# Altium PCB BMS042A_PCB.PcbDoc (part 5 of 5)
Units mil, origin at the board's own origin, x right, y up, seen from the top; angles counter-clockwise.
Board outline 4409.45 x 3307 mil, 6 copper layers (Top Layer, Layer 2 - PGND, Layer 3, Layer 4, Layer 5 - PGND, Bottom Layer), stack 60.8 mil thick; 273 components, 77 nets, 544 pads, 927 vias.
Unrouted connection lines stored in the file: 219.
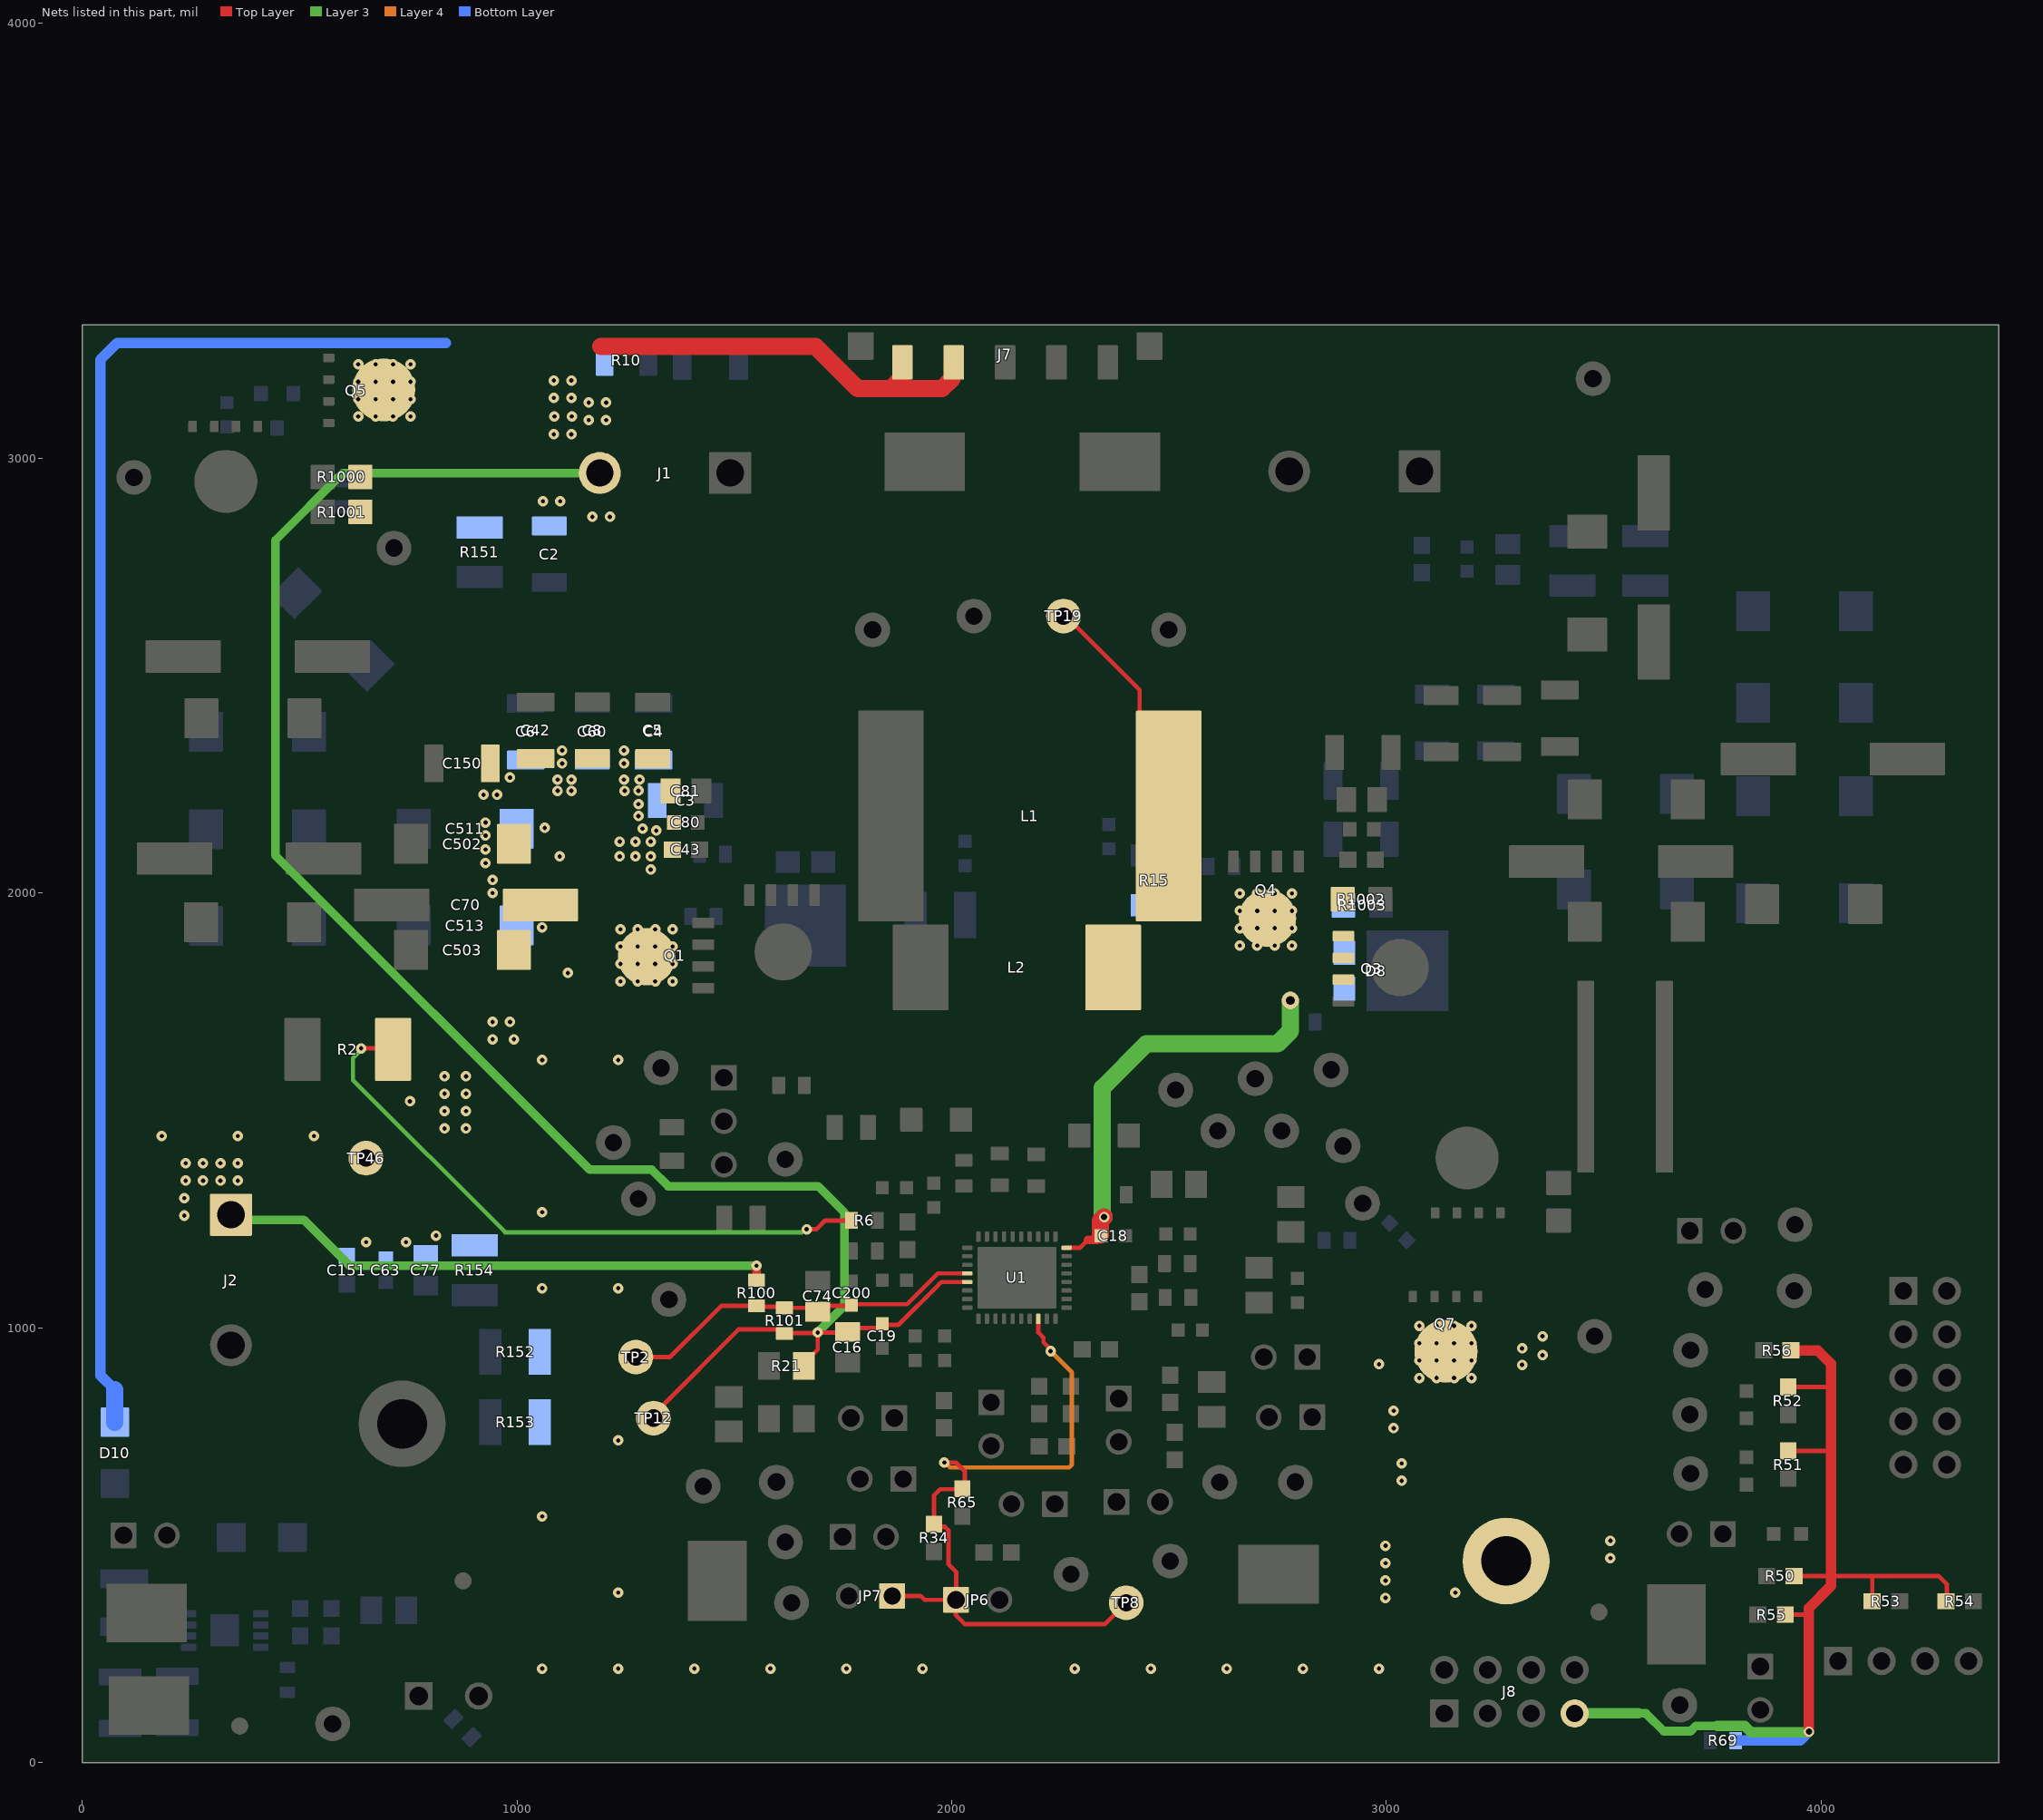
[diagram p7: the nets of this part, all layers, seen from the top]

## Via types
v1: diameter 24, hole 10, Top Layer to Bottom Layer, tented both sides, 653 vias
v2: diameter 24, hole 9.8, Top Layer to Bottom Layer, tented both sides, 132 vias
v3: diameter 24, hole 14, Top Layer to Bottom Layer, tented both sides, 105 vias
v4: diameter 40, hole 20, Top Layer to Bottom Layer, tented both sides, 21 vias
v5: diameter 19.68, hole 7.87, Top Layer to Bottom Layer, tented both sides, 16 vias

## Nets (pads, with @x,y where several pads share a name; then routed paths per layer and width w, separated by ;. In a path a pad name is that pad's centre, name@x,y a point inside that pad or via, vN(x,y) a via of type N, cw(c..) or ccw(c..) an arc to the next point about the centre after c; other vN are vias at no path point) (continued)
SW2: C18.2 D8.1 D8.2 L1.2 L2.2 Q3.1 Q3.2 Q3.3 Q4.5-6-7-8 R15.2 R1002.1 R1003.1 TP19.1 U1.18 | length 1557.2
  Top Layer w9.84: U1.18@2264.2,1184.14 2295.58,1184.14 2307.09,1195.65
  Top Layer w10: TP19.1@2257.14,2637 2262.19,2637 2432.23,2466.96 2432.23,2243.89 L1.2@2499.14,2176.98 ; 2307.09,1195.65 2313.22,1201.78 ; C18.2@2333.89,1201.78 C18.2@2343.89,1211.78 C18.2@2342.36,1213.31
  Top Layer w20: 2313.22,1201.78 C18.2@2333.89,1201.78
  Top Layer w40: C18.2@2342.36,1213.31 2342.36,1246.63 v3(2350.49,1254.76)
  Layer 3 w40: v3(2350.49,1254.76) 2346.55,1258.71 2346.55,1551.7 2448.01,1653.16 2750,1653.16 2779.2,1682.35 2779.2,1747.25 2779.02,1747.43 v4(2779.02,1752.79)
  other v2: 2662.9,1879.01 2702.9,1879.01 2742.9,1879.01 2782.9,1879.01 2662.9,1919.01 2702.9,1919.01 2742.9,1919.01 2782.9,1919.01 2662.9,1959.01 2702.9,1959.01 2742.9,1959.01 2782.9,1959.01 2662.9,1999.01 2702.9,1999.01 2742.9,1999.01 2782.9,1999.01
SYS: C74.1 C200.1 R100.1 R101.2 TP2.1 U1.32 | length 848.7
  Top Layer w9.84: 1967.91,1125.09 U1.32@2035.85,1125.09
  Top Layer w10: TP2.1@1273.45,932.59 1351.94,932.59 1469.74,1050.39 R100.1@1551.11,1050.39 1553.42,1048.08 R101.2@1612.97,1048.08 ; R101.2@1615.29,1045.77 1682.9,1045.77 C74.1@1691.61,1037.06 ; C74.1@1690.6,1050.28 1768.18,1050.28 C200.1@1769.58,1051.68 1772.12,1054.22 1897.12,1054.22 1967.91,1125.01
  Top Layer w20: R101.2@1612.97,1048.08 R101.2@1615.29,1045.77
TS: JP6.1 JP7.1 R34.1 R65.2 TP8.1 U1.8 | length 1718.5
  Top Layer w9.84: 2199.23,989.1 U1.8@2199.23,1020.76
  Top Layer w10: JP7.1@1863.1,383.15 1928.48,383.15 1937.56,374.06 JP6.1@2009.85,374.06 ; v1(1983.09,690) 2010.14,690 2030.1,670.04 2030.1,635.59 2024.4,629.89 R65.2@2024.57,629.73 2023.38,628.54 1973.23,628.54 1959.43,614.74 R34.1@1959.43,548.32 1959.43,547.33 1964.28,542.49 1984.17,542.49 1992.97,533.69 1992.97,455.32 2010.62,437.68 2010.62,374.83 JP6.1@2009.85,374.06 ; 2199.31,989.13 2211.07,977.37 2211.07,966.31 2227.42,949.96 v1(2227.42,946.17) ; TP8.1@2401.38,367.5 2351.96,318.08 2030.53,318.08 2009.27,339.34 2009.27,373.48 JP6.1@2009.85,374.06
  Layer 4 w10: v1(1983.09,690) 1984.75,690 1995.95,678.8 2270.51,678.8 2276.36,684.66 2276.36,897.23 v1(2227.42,946.17)
VAC: C2.2 C16.1 C19.1 D10.2 J1.2 J7.4 J7.5 Q5.5-6-7-8 R10.2 R21.2 R101.1 R151.2 R1000.1 R1001.1 TP12.1 U1.33 | length 8694.4
  Top Layer w9.84: 1970.39,1099.43 1970.39,1099.54 1976.25,1105.4 U1.33@2035.85,1105.4
  Top Layer w10: TP12.1@1314.24,760.32 TP12.1@1314.24,808.29 ; TP12.1@1331,816.81 1510.48,996.29 1605.71,996.29 R101.1@1615.29,986.72 1616.48,987.91 1690.42,987.91 v1(1691.61,989.1) ; R21.2@1659.96,912.07 1659.96,918.57 1691.61,950.22 v1(1691.61,989.1) ; C19.1@1840.37,1006.65 1877.61,1006.65 1970.39,1099.43 ; C19.1@1840.37,1009.03 1830.81,999.46 1769.89,999.46 C16.1@1760.89,990.46 1759.53,989.1 v1(1691.61,989.1)
  Top Layer w40: 1192.48,3257 1686.95,3257 1783.96,3160 1859.64,3160 ; J7.5@1886.69,3220.53 1883.07,3216.91 1883.07,3183.43 1859.64,3160 ; J7.4@2004.8,3220.53 2001.18,3216.91 2001.18,3183.43 1977.75,3160 1859.64,3160
  Layer 3 w20: J1.2@1190.42,2966.06 599.06,2966.06 444.49,2811.49 444.49,2086.51 1167.49,1363.51 1310.1,1363.51 1347.99,1325.63 1692.8,1325.63 1753.69,1264.73 1753.69,1051.18 v1(1691.61,989.1)
  Bottom Layer w24: 75,857.5 42,890.5 42,3226.94 80.06,3265 836.73,3265
  Bottom Layer w40: D10.2@75,782.97 75,857.5
  other v1: 1173.64,2865.32 1213.64,2865.32 1059.62,2901.32 1099.62,2901.32 1085,3055 1125,3055 1165,3088 1205,3088 1086.2,3095.93 1126.2,3095.93 1165,3128 1205,3128 1085,3139 1125,3139 1085,3179 1125,3179
  other v2: 635,3096 675,3096 715,3096 755,3096 635,3136 675,3136 715,3136 755,3136 635,3176 675,3176 715,3176 755,3176 635,3216 675,3216 715,3216 755,3216
VIN3V3: J8.7 R50.2 R51.2 R52.2 R53.2 R54.2 R55.2 R56.2 R69.2 | length 2429.6
  Top Layer w10: R55.2@3917.5,340 3972,340 ; R52.2@3924,863.5 4018.24,863.5 4022.98,858.76 ; R51.2@3924.56,716.6 4020.57,716.6 4022.98,719 ; R50.2@3937.54,429 4022.98,429 4119,429 ; R53.2@4117.5,371 4117.5,427.5 4119,429 ; R54.2@4290.5,371 4289,372.5 4289,410.16 4270.16,429 4119,429
  Top Layer w24: R56.2@3930.5,948 3992,948 4022.98,917.02 4022.98,858.76 4022.98,719 4022.98,429 4022.98,406.28 3972,355.3 3972,340 v3(3972,71)
  Layer 3 w20: 3579.97,113 3597,113 3637.84,72.16 3699.79,72.16 3711.92,84.29 3760.83,84.29
  Layer 3 w24: J8.7@3433,113 3579.97,113 ; 3760.83,84.29 3824.06,84.29 3838.72,69.63 3970.63,69.63 v3(3972,71)
  Bottom Layer w24: R69.2@3803.53,50.37 3804.16,51 3952,51 v3(3972,71)
VSYS: C3.1 C4.1 C5.2 C6.1 C8.2 C42.2 C43.1 C60.1 C63.1 C70.2 C77.1 C80.1 C81.1 C150.2 C151.1 C502.2 C503.2 C511.2 C513.2 J2.1 pad.Pad1 Q1.5-6-7-8 Q7.5-6-7-8 R2.2 R6.2 R100.2 R152.2 R153.2 R154.2 TP46.1 | length 2748.3
  Top Layer w10: v1(641.66,1642.82) 712.64,1642.82 R2.2@714.95,1640.5 ; v1(1666.43,1226.63) 1688.77,1226.63 1708.69,1246.56 R6.2@1769.13,1246.56
  Top Layer w20: R100.2@1551.11,1109.45 v1(1551.11,1142.91)
  Layer 3 w10: v1(641.66,1642.82) 641.66,1639.03 623,1620.37 623,1569.5 972.87,1219.63 1655.64,1219.63 1662.64,1226.63 v1(1666.43,1226.63)
  Layer 3 w20: J2.1@342.13,1259.78 353.66,1248.25 509.25,1248.25 614.59,1142.91 v1(1551.11,1142.91)
  other v1: 1058,216 1233,216 1408,216 1583,216 1758,216 1933,216 2283,216 2458,216 2633,216 2808,216 2983,216 2998.01,378.52 1233,391 3158.45,390.71 2998.01,418.52 2998.01,458.52 3515.1,470.12 2998.01,498.52 3515.1,510.12 1058,566 3035.1,647.91 3035.1,687.91 1233,741 3016.59,769.13 3016.59,809.13 3312,914.85 2983,916 3359,936.87 3312,952.64 3359,980.4 1058,1091 1233,1091 653,1197 745,1197 814,1212 235,1258 1058,1266 235,1298 238,1338.61 278,1338.61 318,1338.61 358,1338.61 238,1378.61 278,1378.61 318,1378.61 358,1378.61 183,1441 358,1441 533,1441 833.55,1458.45 882.81,1458.45 833.55,1498.45 882.81,1498.45 754,1521 833.55,1538.45 882.81,1538.45 833.55,1578.45 882.81,1578.45 1058,1616 1233,1616 943.9,1663.4 993.16,1663.4 943.9,1703.4 983.95,1703.4 1117,1816 1058.04,1921.2 943.95,1999.99 943.9,2030 1307.79,2054 927.58,2069.01 1098.49,2084 1236.46,2084 1272.48,2084 1307.79,2084 927.58,2100 1236.46,2118.27 1272.48,2118.27 1307.79,2118.27 927.58,2132 1320.71,2143.66 1288.74,2148.22 1063.95,2149.84 927.58,2162.04 1279.4,2176.98 1279.4,2204.55 923,2225.92 954,2225.92 1093.62,2235.16 1125,2235 1247.74,2235 1279.39,2235.23 1093.62,2260.73 1125,2260.73 1246,2260.73 1282.16,2260.73 983.95,2265.72 1103.95,2297.91 1246,2297.91 1104,2328 1246,2328
  other v2: 3075.65,884.56 3115.65,884.56 3155.65,884.56 3195.65,884.56 3075.65,924.56 3115.65,924.56 3155.65,924.56 3195.65,924.56 3075.65,964.56 3115.65,964.56 3155.65,964.56 3195.65,964.56 3075.65,1004.56 3115.65,1004.56 3155.65,1004.56 3195.65,1004.56 1237.97,1796.89 1277.97,1796.89 1317.97,1796.89 1357.97,1796.89 1237.97,1836.89 1277.97,1836.89 1317.97,1836.89 1357.97,1836.89 1237.97,1876.89 1277.97,1876.89 1317.97,1876.89 1357.97,1876.89 1237.97,1916.89 1277.97,1916.89 1317.97,1916.89 1357.97,1916.89
pads on no net: D1.2 FID1.1 FID2.1 FID3.1 FID4.1 FID5.1 FID6.1 H1.0 H2.0 H3.0 H4.0 J4.1 J4.2 J4.3 J4.4 J4.5 J4.7 J4.8 J5.4 LBL1.0 SH-JP1.0 SH-JP2.0 SH-JP3.0 SH-JP4.0 SH-JP5.0 SH-JP6.0 SH-JP7.0 SH-JP8.0 SH-JP9.0 SH-JP10.0 SH-JP11.0 U2.3 U2.6 U2.7

## Polygon pours and split planes (outlines as drawn)
PGND on Top Layer "TOP_LAYER_PGND_P669" (solid, remove dead copper, pour order 669): 1,3310 1,-1 4409.45,-1 4409.45,3304.45 4410,3305 2,3305 0,3307
BAT on Top Layer "TOP_LAYER_BAT_P668" (solid, remove dead copper, pour order 668): 3428,1838.67 3428,1307 4434,1307 4434,3309 4436,3311 2939.16,3311 2939.16,2781 3971,2781 3971,1838.67
VSYS on Top Layer "Top Layer-NetC3_1" (solid, remove dead copper, pour order 621): 0,1145 1001,1145 1001,-1 3539.82,-1 3539.82,1052.11 2944.31,1052.11 2944.31,318.08 1326.85,318.08 1326.85,1443.5 1376.14,1443.5 1376.14,2350.2 897.88,2350.2 897.88,1792.06 623,1791.94 623,1479.85 0,1480.09
SW1 on Top Layer "TOP_LAYER_SW1_P636" (solid, remove dead copper, pour order 636): 1387.59,1942.21 1759.9,1942.21 1759.9,2443.4 1999.6,2443.4 2035.85,2443.4 2035.85,1640.5 1387.59,1640.5
AC_OUT on Top Layer "Top Layer-NetC7_2" (solid, remove dead copper, pour order 626): -26,1468 679.82,1468 679.82,1794 429,1794 429,2615.1 584,2615.1 584,3032 -25,3032 -25,2980 -26,2979
NetC9_1 on Top Layer "TOP_LAYER_NETC9_1_P627" (solid, remove dead copper, pour order 627): 585,3312 583,3310 583,3055 -14,3055 -14,3314 584,3314
P_OUT on Top Layer "TOP_LAYER_P_OUT_P628" (solid, remove dead copper, pour order 628): 2955.65,1305.62 3539.82,1305.62 3539.82,2372.28 2955.65,2372.28
BAT_SRC on Top Layer "TOP_LAYER_BAT_SRC_P607" (solid, remove dead copper, pour order 607): 2955.65,1280.39 3539.82,1280.39 3539.82,1054.04 2955.65,1054.04
VAC on Top Layer "TOP_LAYER_VAC_P616" (solid, remove dead copper, pour order 616): 1328.47,3314 1328.47,2795.71 610,2795.71 610,2918.6 610,3314
SW2 on Top Layer "TOP_LAYER_SW2_P662" (solid, remove dead copper, pour order 662): 2254.33,2443.4 2254.33,1720.27 2932.21,1720.27 2933.1,1721.16 2929,1725.26 2929,2019.87 2591.58,2019.87 2591.58,2443.4
PGND on Layer 3 "LAYER_3_-_PGND_PGND_P550" (solid, remove dead copper, pour order 673): 4409.45,-5 5,-5 0,0 0,3343.16 4409.45,3343.16
VAC on Layer 3 "Layer 3-VAC" (solid, remove dead copper, pour order 603): 460,2881.6 1282.14,2881.6 1280,2883.74 1280,3311 0,3311 0,3119.74 460,3119.74
AC_OUT on Layer 3 "LAYER_3_AC_OUT_P657" (solid, remove dead copper, pour order 657): 0,3134 444.49,3134 444.49,2343.58 0,2343.58
P_OUT on Layer 3 "LAYER_3_P_OUT_P658" (solid, remove dead copper, pour order 658): 2674.99,2096.96 2674.99,1598.6 3359.4,1598.6 3465,1598.6 3465,2096.96
P_OUT on Layer 3 "LAYER_3_P_OUT_P659" (solid, remove dead copper, pour order 659): 3011.93,1152.03 3405.1,1152.03 3405.1,1662.47 3011.93,1662.47
VSYS on Layer 3 "LAYER_3_VSYS_P660" (solid, remove dead copper, pour order 660): 1081.81,2139.21 1085,2136.02 1085,1676 1495.82,1676 1486.12,1685.69 1486.12,2139.21
VSYS on Layer 3 "LAYER_3_VSYS_P672" (solid, remove dead copper, pour order 672): 2925.9,839.53 3481.13,839.53 3481.13,1088 2925.9,1088
PGND on Layer 4 "LAYER_4_PGND_P671" (solid, remove dead copper, pour order 671): 1,3310 1,-1 4409.45,-1 4409.45,3304.45 4410,3305 2,3305 0,3307
BAT on Layer 4 "LAYER_4_BAT_P670" (solid, remove dead copper, pour order 670): 3428,1838.67 3428,1307 4434,1307 4434,3309 4436,3311 2939.16,3311 2939.16,2781 3971,2781 3971,1838.67
VSYS on Layer 4 "LAYER_4_VSYS_P640" (solid, remove dead copper, pour order 640): 0,1145 1001,1145 1001,-1 3539.82,-1 3539.82,1052.11 2944.31,1052.11 2944.31,318.08 1326.85,318.08 1326.85,1443.5 1376.14,1443.5 1376.14,2350.2 897.88,2350.2 897.88,1792.06 623,1791.94 623,1479.85 0,1480.09
AC_OUT on Layer 4 "LAYER_4_AC_OUT_P641" (solid, remove dead copper, pour order 641): -26,1468 679.82,1468 679.82,1794 429,1794 429,2615.1 584,2615.1 584,3032 -25,3032 -25,2980 -26,2979
P_OUT on Layer 4 "LAYER_4_P_OUT_P643" (solid, remove dead copper, pour order 643): 2955.65,1305.62 3539.82,1305.62 3539.82,2372.28 2955.65,2372.28
BAT_SRC on Layer 4 "LAYER_4_BAT_SRC_P637" (solid, remove dead copper, pour order 637): 2955.65,1280.39 3539.82,1280.39 3539.82,1054.04 2955.65,1054.04
VAC on Layer 4 "LAYER_4_VAC_P639" (solid, remove dead copper, pour order 639): 1328.47,3314 1328.47,2795.71 610,2795.71 610,2918.6 610,3314
NetC9_1 on Layer 4 "LAYER_4_NETC9_1_P642" (solid, remove dead copper, pour order 642): 585,3312 583,3310 583,3055 -14,3055 -14,3314 584,3314
SW1 on Layer 4 "LAYER_4_SW1_P644" (solid, remove dead copper, pour order 644): 1387.98,2019.87 1746.9,2019.87 1958.45,2019.87 1958.45,1725.95 1389.38,1725.95 1387.98,1727.36
SW2 on Layer 4 "LAYER_4_SW2_P646" (solid, remove dead copper, pour order 646): 2339.6,2019.87 2339.6,1720.27 2932.21,1720.27 2933.1,1721.16 2929,1725.26 2929,2019.87 2591.58,2019.87
PGND on Bottom Layer "BOTTOM_LAYER_PGND_P656" (solid, remove dead copper, pour order 656): 1,3310 1,-1 4409.45,-1 4409.45,3304.45 4410,3305 2,3305 0,3307
BAT on Bottom Layer "BOTTOM_LAYER_BAT_P655" (solid, remove dead copper, pour order 655): 3428,1838.67 3428,1307 4434,1307 4434,3309 4436,3311 2939.16,3311 2939.16,2781 3971,2781 3971,1838.67
VSYS on Bottom Layer "BOTTOM_LAYER_VSYS_P649" (solid, remove dead copper, pour order 649): 0,1145 1001,1145 1001,-1 3539.82,-1 3539.82,1052.11 2944.31,1052.11 2944.31,318.08 1326.85,318.08 1326.85,1443.5 1376.14,1443.5 1376.14,2350.2 897.88,2350.2 897.88,1792.06 623,1791.94 623,1479.85 0,1480.09
VAC on Bottom Layer "BOTTOM_LAYER_VAC_P648" (solid, remove dead copper, pour order 648): 1328.47,3314 1328.47,2795.71 610,2795.71 610,2918.6 610,3314
AC_OUT on Bottom Layer "BOTTOM_LAYER_AC_OUT_P650" (solid, remove dead copper, pour order 650): -26,1468 679.82,1468 679.82,1794 429,1794 429,2615.1 584,2615.1 584,3032 -25,3032 -25,2980 -26,2979
NetC9_1 on Bottom Layer "BOTTOM_LAYER_NETC9_1_P651" (solid, remove dead copper, pour order 651): 585,3312 583,3310 583,3055 -14,3055 -14,3314 584,3314
P_OUT on Bottom Layer "BOTTOM_LAYER_P_OUT_P652" (solid, remove dead copper, pour order 652): 2955.65,1305.62 3539.82,1305.62 3539.82,2372.28 2955.65,2372.28
BAT_SRC on Bottom Layer "BOTTOM_LAYER_BAT_SRC_P647" (solid, remove dead copper, pour order 647): 2955.65,1280.39 3539.82,1280.39 3539.82,1054.04 2955.65,1054.04
SW1 on Bottom Layer "BOTTOM_LAYER_SW1_P653" (solid, remove dead copper, pour order 653): 1387.98,2019.87 1746.9,2019.87 1958.45,2019.87 1958.45,1725.95 1389.38,1725.95 1387.98,1727.36
SW2 on Bottom Layer "BOTTOM_LAYER_SW2_P654" (solid, remove dead copper, pour order 654): 2339.6,2019.87 2339.6,1720.27 2932.21,1720.27 2933.1,1721.16 2929,1725.26 2929,2019.87 2591.58,2019.87
PGND on Layer 2 - PGND "LAYER_2_-_PGND_PGND_P532" (solid, remove dead copper, pour order 532): 4409.45,-5 5,-5 0,0 0,3345 4409.45,3345
PGND on Layer 5 - PGND "LAYER_5_-_PGND_PGND_P533" (solid, remove dead copper, pour order 533): 4409.45,-5 5,-5 0,0 0,3545 4409.45,3545

## Keep-outs
Keep-Out Layer:
  text ".Layer_Name" at 577,-858.49 h60

## Other copper
Top Layer:
  pour cut-out: 2688.25,1309.19 2688.25,1277.84 2726.91,1277.84 2726.91,1309.19
  pour cut-out: 1425.89,1450.68 1425.89,1397.38 1530.79,1397.38 1530.79,1450.68
  pour cut-out: 2467.39,1127.84 2506.56,1127.84 2506.77,1128.04 2506.77,1178.74 2530.27,1178.74 2531.01,1177.99 2531.01,1129.62 2577.19,1129.62 2577.19,1093.93 2537.36,1093.93 2537.36,1046.35 2504,1046.35 2504,1090.99 2467.39,1090.99
  pour cut-out: 1319.97,1443.5 1393.67,1443.5 1394.22,1444.05 1394.22,1398.42 1395.27,1397.38 1394.89,1397 1319.97,1397
  pour cut-out: 1489.27,1299.47 1489.27,1213.4 1539.29,1213.4 1539.29,1298.48 1538.3,1299.47
  pour cut-out: 2311.62,1393.16 2397.9,1393.16 2397.9,1493.79 2311.62,1493.79
  pour cut-out: 1926,1416.62 1928.4,1416.62 2008.11,1416.62 2008.11,1510 2005.2,1507.09 1926,1507.09
  pour cut-out: 1929.02,1014.94 1929.02,949.12 1970.39,949.12 1970.39,1014.94
  pour cut-out: 1604.81,963.14 1604.81,864.77 1635.27,864.77 1635.27,963.14
  pour cut-out: 2224,858 2223.78,857.78 2223.78,750.79 2259.46,750.79 2259.46,857.99 2224.66,857.99 2224.44,857.77
  pour cut-out: 2557.71,815.35 2641.73,815.35 2641.73,857.77 2641.29,858.21 2557.71,858.21
  pour cut-out: 2666.72,1113.36 2667.13,1112.95 2667.13,1082 2748.89,1082 2748.89,1114.24 2667.13,1114.24
  pour cut-out: 2735.95,1278.68 2735.95,1242.58 2822.75,1242.58 2824.04,1241.28 2824.26,1241.5 2824.26,1278.68
  pour cut-out: 1525.9,1063.08 1581.81,1063.08 1581.81,1095.54 1582.87,1096.6 1525.9,1096.6
  pour cut-out: 525.99,1607.72 698.26,1607.72 698.26,1676.72 525.99,1676.72
  pour cut-out: 2846,3305 2846,2761.37 3005.11,2761.37 3005.11,3305
  pour cut-out: 1266.02,2761.82 1419.05,2761.82 1419.05,3310 1266.02,3310
  pour cut-out: 2584.26,1143.82 2584.26,1057.06 2621.69,1057.06 2621.69,1143.82
  pour cut-out: 3456.32,1553.5 3642,1553.5 3642,1634.58 3456.32,1634.58
  pour cut-out: 1634.67,1256 1634.67,1158.56 1704.41,1158.56 1704.56,1158.72 1704.56,1256
  pour cut-out: 2043,2454 2043,1602.34 2285.6,1602.34 2285.6,2454
  pour cut-out: 1532.05,1159.24 1532.05,1127.89 1570.7,1127.89 1570.7,1159.24
  pour cut-out: 1672.07,1003.82 1672.07,972.47 1710.73,972.47 1710.73,1003.82
  pour cut-out: 1782.42,1278.77 1782.42,1156.91 1783.21,1156.13 1783.62,1156.54 1813.83,1156.54 1813.83,1276.81 1815.79,1278.77
  pour cut-out: 533.1,1058.38 533.1,1208.06 -6.9,1208.06 -6.9,1058.38
  pour cut-out: 1746.9,1496.96 1772.9,1496.96 1797.33,1496.96 1797.33,1428.96 1746.9,1428.96 1746.9,1430.96
Layer 2 - PGND:
  pour cut-out: 2688.25,1309.21 2688.25,1277.86 2726.91,1277.86 2726.91,1309.21
  pour cut-out: 525.99,1607.72 698.26,1607.72 698.26,1676.72 525.99,1676.72
  pour cut-out: 1532.05,1159.24 1532.05,1127.89 1570.7,1127.89 1570.7,1159.24
  pour cut-out: 2584.26,1143.82 2584.26,1057.06 2621.69,1057.06 2621.69,1143.82
  pour cut-out: 3482.18,1557.54 3616.35,1557.54 3616.35,1628.54 3482.18,1628.54
  pour cut-out: 1672.07,1003.84 1672.07,972.49 1710.73,972.49 1710.73,1003.84
  pour cut-out: 1634.67,1256 1634.67,1158.56 1704.41,1158.56 1704.56,1158.72 1704.56,1256
Layer 3:
  pour cut-out: 2733.35,1333.97 2733.35,1277.61 2733.26,1277.52 2732.92,1277.86 2682.69,1277.86 2682.69,1333.97
  pour cut-out: 2688.53,1309.21 2688.53,1277.86 2727.18,1277.86 2727.18,1309.21
  pour cut-out: 2817.87,1646.84 2817.87,1534.74 2927.38,1534.74 2927.38,1646.84
  pour cut-out: 525.99,1607.72 698.26,1607.72 698.26,1676.72 525.99,1676.72
  pour cut-out: 1668.99,1000.48 1729.05,1060.54 1729.05,1247.17 1678.1,1298.12 1331.21,1298.12 1290.41,1338.93 1290.41,1342.4 1146.12,1342.4 406,2082.52 406,2842 561.88,2997.88 1172,2997.88 1172,2934 623.33,2934 484,2794.67 484,2090.09 1177.09,1397 1331.21,1397 1368,1360.21 1368,1356 1369,1357 1369,1358 1695.88,1358 1775.11,1278.77 1775.11,1036.59 1707.65,969.13
  pour cut-out: 358,1229 484.59,1229 600.36,1113.23 1574.72,1113.23 1574.72,1169.02 1575.32,1169.62 1575.32,1169.68 626.72,1169.68 506.4,1290 358,1290
  pour cut-out: 1532.05,1159.24 1532.05,1127.89 1570.7,1127.89 1570.7,1159.24
  pour cut-out: 2584.26,1143.82 2584.26,1057.06 2621.69,1057.06 2621.69,1143.82
  pour cut-out: 3482.18,1557.54 3616.35,1557.54 3616.35,1628.54 3482.18,1628.54
  pour cut-out: 2572.08,1147.83 2572.08,1138.92 2572.08,1055.31 3359.31,1055.31 3580.35,1276.35 3580.35,1572.84 3515.1,1572.84 3515.1,1339.9 3323.03,1147.83
  pour cut-out: 552.97,1665.91 552.97,1578.03 954.73,1176.27 1650.88,1176.27 1650.88,1246.42 1651.72,1247.26 970.74,1247.26 672.21,1545.79 672.21,1665.91
  pour cut-out: 2693.67,1333.97 3109.48,1742.76 3109.48,2894.15 3077.56,2926.08 3122.13,2970.65 3148.23,2944.54 3148.23,1726.87 2723.19,1301.82
  pour cut-out: 1672.35,1003.84 1672.35,972.49 1711.01,972.49 1711.01,1003.84
  pour cut-out: 1634.67,1256 1634.67,1158.56 1704.41,1158.56 1704.56,1158.72 1704.56,1256
Layer 4:
  pour cut-out: 2688.33,1309.52 2688.33,1278.17 2726.99,1278.17 2726.99,1309.52
  pour cut-out: 525.99,1607.72 698.26,1607.72 698.26,1676.72 525.99,1676.72
  pour cut-out: 1532.05,1159.24 1532.05,1127.89 1570.7,1127.89 1570.7,1159.24
  pour cut-out: 2584.26,1143.82 2584.26,1057.06 2621.69,1057.06 2621.69,1143.82
  pour cut-out: 3482.18,1557.54 3616.35,1557.54 3616.35,1628.54 3482.18,1628.54
  pour cut-out: 1672.16,1004.15 1672.16,972.8 1710.82,972.8 1710.82,1004.15
  pour cut-out: 1634.67,1256 1634.67,1158.56 1704.41,1158.56 1704.56,1158.72 1704.56,1256
Layer 5 - PGND:
  pour cut-out: 2688.53,1309.21 2688.53,1277.86 2727.18,1277.86 2727.18,1309.21
  pour cut-out: 525.99,1607.72 698.26,1607.72 698.26,1676.72 525.99,1676.72
  pour cut-out: 1532.05,1159.24 1532.05,1127.89 1570.7,1127.89 1570.7,1159.24
  pour cut-out: 2584.26,1143.82 2584.26,1057.06 2621.69,1057.06 2621.69,1143.82
  pour cut-out: 3482.18,1557.54 3616.35,1557.54 3616.35,1628.54 3482.18,1628.54
  pour cut-out: 1672.35,1003.84 1672.35,972.49 1711.01,972.49 1711.01,1003.84
  pour cut-out: 1634.67,1256 1634.67,1158.56 1704.41,1158.56 1704.56,1158.72 1704.56,1256
Bottom Layer:
  pour cut-out: 1399.43,3270.14 1399.43,3174.96 1489.86,3174.96 1489.86,3270.24 1489.33,3270.78 1399.41,3270.78
  pour cut-out: 1222.34,3263.9 1222.34,3187.9 1283.34,3187.9 1283.34,3263.82 1282.25,3264.9 1281.25,3263.9 1223.34,3263.9
  pour cut-out: 2688.53,1309.21 2688.53,1277.86 2727.18,1277.86 2727.18,1309.21
  pour cut-out: 1,163 279.53,163 280,163.47 281.11,162.36 281.11,104.04 1.21,104.04 0.44,103.27 0,103.71 0,161.64
  pour cut-out: 361,599 361,435 472.11,435 472.11,596.85 469.97,599
  pour cut-out: 18.03,407 169.78,407 169.78,327.48 18.03,327.48
  pour cut-out: 116.03,563.03 116.03,481.81 181.83,481.81 181.83,563.03
  pour cut-out: 15,747.78 142.02,747.78 142.02,677.22 15,677.22
  pour cut-out: 525.99,1607.72 698.26,1607.72 698.26,1676.72 525.99,1676.72
  pour cut-out: 1532.05,1159.24 1532.05,1127.89 1570.7,1127.89 1570.7,1159.24
  pour cut-out: 2584.26,1143.82 2584.26,1057.06 2621.69,1057.06 2621.69,1143.82
  pour cut-out: 3482.18,1557.54 3616.35,1557.54 3616.35,1628.54 3482.18,1628.54
  pour cut-out: 1672.35,1003.84 1672.35,972.49 1711.01,972.49 1711.01,1003.84
  pour cut-out: 1634.67,1256 1634.67,1158.56 1704.41,1158.56 1704.56,1158.72 1704.56,1256

## Silkscreen, mask and mechanical layers (free items; w line width, h text height)
Top Overlay:
  text "VOUT" at 3299,3271.51 h82.68 r270
  text "PGND" at 2515,3237 h82.68 r270
  text "VIN" at 915.78,3176.76 h82.68 r270
  text "PGND" at 1721.8,3118 h82.68 r270
  text "'.PRJ_Number'.PCB_Rev" at 3844,2964 h108.27
  text "SEE" at 2078,2926 h78.74
  text "USER'S GUIDE" at 1834.56,2805.71 h78.74
  text "ACDRV" at 775,2727 h35
  text "FOR I/O RANGE" at 1731.86,2706.57 h78.74 r0.28
  text "-" at 2720.54,2657.49 h82.68
  text "-" at 1505.93,2647.13 h82.68
  text "+" at 1085,2643.22 h82.68
  text "SW1" at 1882.1,2642 h35
  text "SW2" at 2345.56,2642 h35
  text "+" at 3103.82,2630.22 h82.68
  text "LODRV2" at 2590,2568 h35
  text "LODRV1" at 1555.07,2566.32 h35
  text "BTST2" at 2460.08,1727.53 h35
  text "--->" at 2480.66,1684.25 h20 r270
  text "MODE" at 2667.41,1636.57 h35
  text "SRP" at 2545.26,1612.1 h35
  text "HIDRV1" at 1068.95,1611.07 h35
  text "--->" at 2592.08,1602.34 h20 r270
  text "+" at 1839.29,1550.72 h30 r270
  text "+" at 2272.55,1537.86 h30 r270
  text "-->" at 2990.03,1535.16 h20 r225
  text "HIDRV2" at 3015.7,1519.86 h35
  text "------>" at 1862.82,1394.28 h20
  text "DRV_SUP" at 921,1386.83 h35
  text "SRN" at 2707.9,1353.9 h35
  text "ACN" at 1653.25,1301.53 h35
  text "SDA" at 4015.72,1280 h35 r270
  text "ACP" at 1113,1237 h35
  text "+" at 920.22,1232.81 h82.68 r270
  text "--->" at 3084.86,1192.66 h20 r135
  text "VSYS" at 577,1182 h82.68
  text "BATDRV" at 3065.7,1135.78 h35
  text "SCL" at 4012.66,1131.1 h35 r270
  text "BTST1" at 1138,1092.65 h35
  text "CE" at 3592.82,1059.5 h35
  text "-" at 828,979.67 h82.68
  text "-->" at 2243.6,956.05 h20 r270
  text "PG" at 3568.9,950.81 h35
  text "SYS" at 1108,949.55 h35
  text "--->" at 2137.64,949.96 h20 r315
  text "EXT_I2C" at 4018.58,947.64 h35 r270
  text "PGND" at 579.44,890.78 h82.68
  text "STAT2" at 3601,887.49 h30 r270
  text "BATSRC" at 3333.71,874.42 h35
  text "VAC" at 1150,800 h35
  text "STAT1" at 3591.31,717.12 h30 r270
  text "REFER TO" at 42.57,692 h78.74
  text "--------->" at 1319.24,691.59 h20
  text "ACOV" at 1178.36,681.95 h35
  text "->" at 1503.2,679.42 h20 r315
  text "--->" at 1287.93,619.74 h20
  text "ACUV" at 1137,615.44 h35
  text "USER'S GUIDE" at 250,574.11 h78.74
  text "->" at 1536.38,554.9 h20 r315
  text "--------->" at 1340.76,553.32 h20
  text "FSW_SYNC" at 1049,544.52 h35
  text "FBG" at 2575.61,539.35 h35
  text "FB" at 2790,535.74 h35
  text "FOR I/O" at 327.9,451.66 h78.74 r0.28
  text "EXT_I2C" at 4066,430.83 h35
  text "RANGE" at 418,328.13 h78.74 r0.28
  text "-->" at 2261.63,318.08 h20 r90
  text "------>" at 2648.47,316.03 h20 r135
  text "PGND" at 1363.67,275 h50 r90
  text "TS" at 2429.47,272 h35
  text "ICHG" at 2186,271 h35
  text "REGN" at 1566,268 h35
  text "ILIM_HIZ" at 2576.42,258.83 h35
  text "PGND" at 479,233 h50
  text "/INT" at 3572.44,183 h35 r270
  text "EXT_DRV" at 1077.67,169 h50 r90
  text "11V MAX" at 1148,169 h50 r90
  text "3V3" at 490,159 h30
Bottom Overlay:
  text "CAUTION." at 2609.71,2718.02 h82.68
  text "READ USER GUIDE" at 2776.54,2412 h82.68
  text "BEFORE USE" at 2557.21,2291 h82.68
  text "+" at 210.66,1288 h100 r90
  text "EXT_I2C" at 4092.67,1165 h80 r90
  text "-" at 209.6,1070.32 h100 r90
  text "DIODE+" at 283,784 h25
  text "+" at 516.75,603.54 h30 r90
  text "EXT_I2C" at 4344,346.33 h80
  text "For Demo Purposes Only." at 2613,231 h45
  text "Not for Diagnostic or Therapeutic Use." at 3027,81 h45
Top Paste:
  text ".Layer_Name" at 10161,186 h60
Bottom Paste:
  text ".Layer_Name" at 10182,52 h60
Drill Guide:
  text ".Layer_Name" at 577,-858.49 h60
M1 Board Outline:
  the board outline again, w10
  text ".Layer_Name" at 10177,-355 h60
M2 Board Dimensions:
  rectangle: 0,-275 125,-150
  rectangle: 125,-400 500,-275
  lines w7: 0,-275 1000,-275 ; 125,-400 125,-150 ; 250,-400 250,-150 ; 500,-400 500,-150 ; 750,-400 750,-150 ; 0,-400 1000,-400 1000,-150 0,-150 0,-400
  text ".Layer_Name" at 577,-858.49 h60
M3 3D STEP Top:
  text ".Layer_Name" at 10199,-205 h60
M4 3D STEP Bottom:
  text ".Layer_Name" at 10193,-71 h60
M5 Assembly Top:
  lines w10: -292,-930.17 6308,-930.17 ; -292,-726.83 6310,-726.83 ; -292,-523.5 -292,-1133.5 3713,-1133.5 6310,-1133.5 6310,-523.5 -291.5,-523.5 -291.5,-1133.5 1284,-1133.5 ; 2173,-1133.5 2173,-523.5 ; 3440,-726.83 3440,-523.5 ; 4280,-726.83 4280,-523.5 ; 4902,-1140 4902,-937.17
  text "COMPONENTS MARKED 'DNP' SHOULD NOT BE POPULATED." at 1153.5,-318.5 h60
  text "ASSEMBLY VARIANT:" at 1153,-434 h60
  text ".VariantName" at 2189,-434 h60
  text "PCB VIEWED FROM TOP SIDE" at -228.5,-655.67 h60
  text "BOARD #:" at 2248,-655.67 h60
  text ".PRJ_Number" at 2793.5,-655.67 h60
  text "REV:" at 3638,-655.67 h60
  text ".PCB_Rev" at 3929.5,-655.67 h60
  text "SVN REV:" at 4476,-655.67 h60
  text ".VersionControl_RevNumber" at 4982,-655.67 h60
  text "TID #:" at 2248,-859 h60
  text ".TID" at 2793.5,-859 h60
  text "PLOT NAME =" at -228.5,-1064.34 h60
  text ".plot_File_Name" at 577,-1064.34 h60
  text "GENERATED    :" at 2250,-1064.34 h60
  text ".Print_Date" at 3119.5,-1064.34 h60
  text ".Print_Time" at 3848.5,-1064.34 h60
  text "TEXAS INSTRUMENTS" at 5113,-1064.34 h60
M6 Assembly Bottom:
  lines w10: -292.5,-727.33 6309.5,-727.33 ; -290.5,-930.67 6309.5,-930.67 ; 1115.5,-1140.5 1115.5,-937.67 ; 1737.5,-727.33 1737.5,-524 ; 2577.5,-727.33 2577.5,-524 ; 3844.5,-1134 3844.5,-524 ; 4733.5,-1134 6309,-1134 6309,-524 -292.5,-524 -292.5,-1134 2304.5,-1134 6309.5,-1134 6309.5,-524
  text "COMPONENTS MARKED 'DNP' SHOULD NOT BE POPULATED." at 6102,-318 h60
  text ".VariantName" at 5058,-434 h60
  text "ASSEMBLY VARIANT:" at 6097,-434 h60
  text ".VersionControl_RevNumber" at 1035.5,-656.17 h60
  text "SVN REV:" at 1541.5,-656.17 h60
  text ".PCB_Rev" at 2088,-656.17 h60
  text "REV:" at 2379.5,-656.17 h60
  text ".PRJ_Number" at 3224,-656.17 h60
  text "BOARD #:" at 3769.5,-656.17 h60
  text "PCB VIEWED FROM BOTTOM SIDE" at 6246,-656.17 h60
  text ".TID" at 3224,-859.5 h60
  text "TID #:" at 3769.5,-859.5 h60
  text "TEXAS INSTRUMENTS" at 904.5,-1064.84 h60
  text ".Print_Time" at 2169,-1064.84 h60
  text ".Print_Date" at 2898,-1064.84 h60
  text "GENERATED    :" at 3767.5,-1064.84 h60
  text ".plot_File_Name" at 5440.5,-1064.84 h60
  text "PLOT NAME =" at 6246,-1064.84 h60
M9 Title Sheet:
  drawing of 57 lines, arcs and shapes, not listed
  text "1" at 739.84,8036.5 h70
  text "2" at 3235.5,8036.5 h70
  text "3" at 5724.84,8036.5 h70
  text "4" at 8231.51,8036.5 h70
  text "5" at 10730.5,8036.5 h70
  text "6" at 13235.5,8036.5 h70
  text "A" at -416.5,6893.5 h70
  text "A" at 14383.5,6893.5 h70
  text "B" at -416.5,4513.5 h70
  text "B" at 14383.5,4513.5 h70
  text "C" at -416.5,2138.5 h70
  text "C" at 14383.5,2138.5 h70
  text "PROJECT TITLE:" at 11343.5,277.5 h45
  text ".PRJ_Title" at 11393.5,144.17 h70
  text "DESIGNED FOR:" at 11343.5,-23.5 h45
  text ".PRJ_Customer" at 11393.5,-163.5 h70
  text "D" at -416.5,-231.5 h70
  text "D" at 14383.5,-231.5 h70
  text "FILE NAME:" at 11343.5,-323.5 h45
  text ".PCB_File_Name_No_Path" at 11393.5,-443.5 h70
  text "Texas Instruments (TI) and/or its licensors do not warrant the accuracy or completeness of this specification" at 6374,-605.34 h45
  text "ENGINEER:" at 11343.5,-613.5 h45
  text "LAYOUT BY:" at 12848.5,-613.5 h45
  text "or any information contained therein. TI and/or its licensors do not warrant that this design will meet" at 6329.01,-718 h45
  text ".PRJ_Engineer" at 11393.5,-768.49 h70
  text ".PCB_Layout" at 12899,-768.49 h70
  text "the specifications, will be suitable for your application or fit for any particular purpose, or will operate in" at 6329.01,-830.67 h45
  text ".Layer_Name" at 577,-858.49 h60
  text "ALTIUM DESIGNER VERSION:" at 12848.5,-923.5 h45
  text "an implementation. TI and/or its licensors do not warrant that the design is production worthy. You should" at 6329.01,-943.33 h45
  text "completely validate and test your design implementation to confirm the system functionality for your application." at 6374,-1056 h45
  text ".print_Scale" at 11393.5,-1056.83 h70
  text ".Application_BuildNumber" at 12899,-1056.83 h70
  text "1" at 739.84,-1263.5 h70
  text "2" at 3235.5,-1263.5 h70
  text "3" at 5724.84,-1263.5 h70
  text "4" at 8231.51,-1263.5 h70
  text "5" at 10730.5,-1263.5 h70
  text "6" at 13235.5,-1263.5 h70
M10 Fab Notes:
  drawing of 201 lines, arcs and shapes, not listed
  text "DESIGN INFORMATION" at 12308.02,6618.17 h60
  text "0.25" at 12645,6497 h60
  text "MIN. TRACK WIDTH:" at 11663.46,6486.05 h60
  text "mm" at 12914.46,6486.05 h60
  text "0.25" at 12634,6373 h60
  text "MIN. CLEARANCE:" at 11663.46,6361.92 h60
  text "mm" at 12914.46,6361.92 h60
  text "19.685" at 12525,6249 h60
  text "MIN. VIA PAD SIZE:" at 11663.46,6237.8 h60
  text "MIL" at 12914.46,6237.8 h60
  text "0.05mm (2MIL)" at 12358.46,6107.9 h60
  text "MINIMUM ANNULAR RING" at 11334.23,6099.67 h60
  text "EXTERNAL" at 13066.46,6099.67 h60
  text "PER" at 11534.23,5989.55 h60
  text "IPC-D-275 CLASS 2 LEVEL C" at 11754.23,5989.54 h60
  text "MIL, HOLES" at 13242.46,5889.07 h60
  text "+/-" at 12850,5880.48 h60
  text "+/-" at 13704,5880.48 h60
  text "REGISTRATION TOLERANCES:" at 11334.23,5879.42 h60
  text "METAL" at 12534,5879.42 h60
  text "5" at 13110.2,5879.42 h60
  text "3" at 13943.2,5879.42 h60
  text "MIL" at 14059.46,5879.42 h60
  text "HOLE SIZE TOLERANCE (UNLESS OTHERWISE SPECIFIED):" at 11334.23,5781.1 h60
  text "+/-" at 13704,5778.23 h60
  text "3" at 13943.2,5777.17 h60
  text "MIL" at 14059.46,5777.17 h60
  text "MATERIAL:" at 11259.46,5639.52 h60
  text "FR-4 High Tg" at 12245.9,5511 h60
  text "X" at 12101.46,5503.01 h60
  text "FR-408" at 11680.46,5498.49 h60
  text "OTHER" at 13168.46,5498.49 h60
  text "62 MIL (1.6mm) +/-10%" at 12000.56,5355.46 h60
  text "X" at 11880.46,5353.01 h60
  text "THICKNESS:" at 11334.23,5347.24 h60
  text "OTHER" at 13285.46,5347.24 h60
  text "TOLERANCE:" at 11334.23,5208.92 h60
  text "X" at 12182.46,5208.92 h60
  text "ANSI IPC-6012 TYPE 3 CLASS 2" at 12360.48,5208.92 h60
  text "OTHER +/-" at 12360.46,5064.73 h60
  text "BOW & TWIST:" at 11334.23,4919.54 h60
  text "X" at 12182.46,4919.54 h60
  text "ANSI IPC-6012 TYPE 3 CLASS 2" at 12360.48,4919.54 h60
  text "OTHER +/-" at 12360.46,4772.85 h60
  text "DRILLING:" at 11259.46,4642.23 h60
  text "NC_DRILL FILES" at 13020.46,4537.04 h60
  text "REFERENCE:" at 11334.23,4533.1 h60
  text "X" at 11991.46,4533.01 h60
  text "AS SHOWN" at 12169.46,4533.1 h60
  text "X" at 12892.46,4533.1 h60
  text "OTHER" at 13318.46,4390.85 h60
  text "PTH COPPER THICKNESS:" at 11333.91,4387.32 h60
  text "X" at 12473.14,4387.32 h60
  text "20-30 um" at 12601.14,4387.32 h60
  text "BOARD FINISH:" at 11259.46,4239.73 h60
  text "SILKSCREEN:" at 11414.68,4129.6 h60
  text "X" at 12372.46,4129.6 h60
  text "TOP" at 12489.46,4129.6 h60
  text "X" at 12882.46,4129.6 h60
  text "BOTTOM" at 13000.46,4129.6 h60
  text "SILKSCREEN COLOR:" at 11414.68,3974.41 h60
  text "X" at 12371.46,3974.41 h60
  text "WHITE" at 12489.46,3974.41 h60
  text "OTHER" at 13000.46,3974.41 h60
  text "X" at 12502.46,3830.96 h60
  text "GREEN" at 12620.46,3830.96 h60
  text "OTHER" at 13238.46,3830.96 h60
  text "SOLDER RESIST COLOR:" at 11414.68,3824.1 h60
  text "X" at 12502.46,3676.71 h60
  text "MATTE" at 12620.46,3676.71 h60
  text "SEMI-GLOSS" at 13238,3676.07 h60
  text "IMMERSION GOLD (ENIG)" at 12320.46,3503.94 h60
  text "ENEPIG" at 13658,3496.72 h60
  text "SURFACE FINISH:" at 11259.46,3495.72 h60
  text "X" at 12142.46,3495.72 h60
  text "IMM. TIN/SILVER OR EQUIV" at 11589,3358.4 h60
  text "OTHER" at 13020.46,3354.47 h60
  text "ARRAY/PANEL:" at 11259.46,3199.09 h60
  text "CUT AND TRIM PER M1 BOARD OUTLINE" at 12320.46,3190.87 h60
  text "N.C. ROUTE" at 12320.46,3054.9 h60
  text "X" at 13008.46,3054.9 h60
  text "V. SCORE" at 13186.46,3054.9 h60
  text "CERTIFICATION:" at 11259.46,2925.77 h60
  text "MATERIALS AND WORKMANSHIP FOR ALL PCBS" at 11984.46,2925.77 h60
  text "TO MEET OR EXCEED THE REQUIREMENTS OF:" at 11984.46,2831.71 h60
  text "X" at 11621.97,2703.08 h60
  text "ANSI IPC-A-600F CLASS ->" at 11749.96,2703.08 h60
  text "X" at 13397.97,2703.08 h60
  text "2" at 13507.96,2703.08 h60
  text "1" at 13192.96,2701.58 h60
  text "3" at 13861.96,2701.58 h60
  text "X" at 12433.97,2555.39 h60
  text "RoHS" at 12561.96,2555.39 h60
  text "OTHER" at 13206.36,2555.39 h60
  text "PER ORDER" at 13603.42,2555.39 h60
  text "ALL BOARDS MUST MEET OR EXCEED UL94-V0 REQUIREMENTS." at 11287,2401.57 h60
  text "PCB MUST BEAR THE UL94V-0 UL REGISTERED MATERIAL ID NUMBER" at 11287,2285.5 h60
  text "ADDITIONAL REQUIREMENTS:" at 11259.46,2116.08 h60
  text "MICROSECTION:" at 11334.23,2008.95 h60
  text "YES" at 12239.96,2008.95 h60
  text "REQUIRED" at 13101.46,1864.62 h60
  text "BARE BOARD ELEC. TEST:" at 11334.23,1861.76 h60
  text "NONE" at 12639.96,1861.76 h60
  text "X" at 12983.46,1861.76 h60
  text "PER ORDER" at 13693.46,1861.76 h60
  text "9.8 MIL & 7.87 MIL VIAS REQUIRE NON-CONDUCTIVE FILL AND PLANARIZE" at 11520,1647 h50
  text "XX MIL VIAS REQUIRE CONDUCTIVE FILL AND PLANARIZE" at 11510.38,1552.84 h60
  text "OUTER XX MIL TRACES REQUIRE 50 OHM SINGLE-ENDED IMPEDANCE" at 11509.39,1389.46 h58
  text "LAYER 2 & 3 (INNER LAYERS) XX MIL WIDE, XX MIL SPACE / TRACES REQUIRE 100 OHM DIFFERENTIAL IMPEDANCE" at 11501.39,1153.74 h60
  text "X" at 11390.02,1036.45 h60
  text "REMOVE PORTION OF SILKSCREEN THAT ARE OVERLAPPING COMPONENT COPPER PADS (SUCH AS L1 SILKSCREEN ON L2)" at 11520,1036.45 h48
  text ".Layer_Name" at 577,-858.49 h60
M11 Gerber Information:
  lines w10: -292,-930.17 6308,-930.17 ; -292,-726.83 6310,-726.83 ; -292,-523.5 -292,-1133.5 3713,-1133.5 6310,-1133.5 6310,-523.5 -291.5,-523.5 -291.5,-1133.5 1284,-1133.5 ; 2173,-1133.5 2173,-523.5 ; 3440,-726.83 3440,-523.5 ; 4280,-726.83 4280,-523.5 ; 4902,-1140 4902,-937.17
  text "ALL ARTWORK VIEWED FROM TOP SIDE" at -228.5,-655.67 h60
  text "BOARD #:" at 2248,-655.67 h60
  text ".PRJ_Number" at 2793.5,-655.67 h60
  text "REV:" at 3638,-655.67 h60
  text ".PCB_Rev" at 3929.5,-655.67 h60
  text "SVN REV:" at 4476,-655.67 h60
  text ".VersionControl_RevNumber" at 4982,-655.67 h60
  text "LAYER NAME =" at -228.5,-858.49 h60
  text "TID #:" at 2248,-859 h60
  text ".TID" at 2793.5,-859 h60
  text "PLOT NAME =" at -228.5,-1064.34 h60
  text ".plot_File_Name" at 577,-1064.34 h60
  text "GENERATED    :" at 2250,-1064.34 h60
  text ".Print_Date" at 3119.5,-1064.34 h60
  text ".Print_Time" at 3848.5,-1064.34 h60
  text "TEXAS INSTRUMENTS" at 5113,-1064.34 h60
M12 Stackup:
  drawing of 536 lines, arcs and shapes, not listed
  text "Layer" at 6243.5,5702.01 h60
  text "Name" at 6653.41,5702.01 h60
  text "Material" at 7613.15,5702.01 h60
  text "Thickness" at 8472.92,5702.01 h60
  text "Constant" at 9122.75,5702.01 h60
  text "Board Layer Stack" at 9692.61,5702.01 h60
  text "Top Overlay" at 6653.41,5582.01 h60
  text "Top Solder" at 6653.41,5462.01 h60
  text "Solder Resist" at 7613.15,5462.01 h60
  text "0.60mil" at 8472.92,5462.01 h60
  text "3.5" at 9122.75,5462.01 h60
  text "1" at 6243.5,5342.01 h60
  text "Top Layer" at 6653.41,5342.01 h60
  text "2.80mil" at 8472.92,5342.01 h60
  text "Dielectric 1" at 6653.41,5222.01 h60
  text "FR-4 High-Tg" at 7613.15,5222.01 h60
  text "9.00mil" at 8472.92,5222.01 h60
  text "4.2" at 9122.75,5222.01 h60
  text "2" at 6243.5,5102.01 h60
  text "Layer 2 - PGND" at 6653.41,5102.01 h60
  text "2.80mil" at 8472.92,5102.01 h60
  text "Dielectric 2" at 6653.41,4982.01 h60
  text "FR-4 High-Tg" at 7613.15,4982.01 h60
  text "10.00mil" at 8472.92,4982.01 h60
  text "4.2" at 9122.75,4982.01 h60
  text "3" at 6243.5,4862.01 h60
  text "Layer 3" at 6653.41,4862.01 h60
  text "2.80mil" at 8472.92,4862.01 h60
  text "Dielectric 4" at 6653.41,4742.01 h60
  text "FR-4 High-Tg" at 7613.15,4742.01 h60
  text "6.00mil" at 8472.92,4742.01 h60
  text "4.2" at 9122.75,4742.01 h60
  text "4" at 6243.5,4622.01 h60
  text "Layer 4" at 6653.41,4622.01 h60
  text "2.80mil" at 8472.92,4622.01 h60
  text "Dielectric 5" at 6653.41,4502.01 h60
  text "FR-4 High-Tg" at 7613.15,4502.01 h60
  text "10.00mil" at 8472.92,4502.01 h60
  text "4.2" at 9122.75,4502.01 h60
  text "5" at 6243.5,4382.01 h60
  text "Layer 5 - PGND" at 6653.41,4382.01 h60
  text "2.80mil" at 8472.92,4382.01 h60
  text "Dielectric 3" at 6653.41,4262.01 h60
  text "FR-4 High-Tg" at 7613.15,4262.01 h60
  text "9.00mil" at 8472.92,4262.01 h60
  text "4.2" at 9122.75,4262.01 h60
  text "6" at 6243.5,4142.01 h60
  text "Bottom Layer" at 6653.41,4142.01 h60
  text "2.80mil" at 8472.92,4142.01 h60
  text "Bottom Solder" at 6653.41,4022.01 h60
  text "Solder Resist" at 7613.15,4022.01 h60
  text "0.60mil" at 8472.92,4022.01 h60
  text "3.5" at 9122.75,4022.01 h60
  text "Bottom Overlay" at 6653.41,3902.01 h60
  text ".Layer_Name" at 577,-858.49 h60
M13 Component Bodies Top:
  text ".Layer_Name" at 577,-858.49 h60
M14 Component Bodies Bottom:
  text ".Layer_Name" at 577,-858.49 h60
M15 Courtyards Top:
  text ".Layer_Name" at 577,-858.49 h60
M16 Courtyards Bottom:
  text ".Layer_Name" at 577,-858.49 h60
Drill Drawing:
  circle w10: c149.62,7064.83 r33.33
  circle w10: c149.62,6464.83 r20
  circle w10: c149.62,6464.83 r33.33
  lines w10: 116.29,6281.5 149.62,6298.17 182.96,6281.5 166.29,6314.83 182.96,6348.17 149.62,6331.5 116.29,6348.17 132.96,6314.83 116.29,6281.5 ; 116.29,6598.17 132.96,6598.17 149.62,6581.5 166.29,6598.17 182.96,6598.17 166.29,6614.83 182.96,6631.5 166.29,6631.5 149.62,6648.17 132.96,6631.5 116.29,6631.5 132.96,6614.83 116.29,6598.17 ; 116.29,6798.17 182.96,6798.17 149.62,6731.5 116.29,6798.17 ; 116.29,6881.5 182.96,6881.5 182.96,6948.17 116.29,6948.17 116.29,6881.5 ; 116.29,7198.17 132.96,7198.17 132.96,7181.5 166.29,7181.5 166.29,7198.17 182.96,7198.17 182.96,7231.5 166.29,7231.5 166.29,7248.17 132.96,7248.17 132.96,7231.5 116.29,7231.5 116.29,7198.17 ; 116.29,7331.5 116.29,7348.17 132.96,7364.83 116.29,7381.5 116.29,7398.17 132.96,7398.17 149.62,7381.5 166.29,7398.17 182.96,7398.17 182.96,7381.5 166.29,7364.83 182.96,7348.17 182.96,7331.5 166.29,7331.5 149.62,7348.17 132.96,7331.5 116.29,7331.5 ; 116.29,7514.83 149.62,7481.5 182.96,7514.83 149.62,7548.17 116.29,7514.83 ; 116.29,7631.5 182.96,7631.5 182.96,7698.17 116.29,7698.17 116.29,7631.5 ; 129.62,6894.83 169.62,6894.83 169.62,6934.83 129.62,6934.83 129.62,6894.83
  lines w15: 56.5,6236.5 10897.48,6236.5 ; 56.5,7736.5 10897.48,7736.5 ; 607.38,6086.5 607.38,7886.5 ; 1257.2,6086.5 1257.2,7886.5 ; 2386.87,6086.5 2386.87,7886.5 ; 2892.75,6086.5 2892.75,7886.5 ; 3626.55,6086.5 3626.55,7886.5 ; 5126.1,6086.5 5126.1,7886.5 ; 5715.95,6086.5 5715.95,7886.5 ; 6461.75,6086.5 6461.75,7886.5 ; 7331.5,6086.5 7331.5,7886.5 ; 8185.26,6086.5 8185.26,7886.5 ; 9518.87,6086.5 9518.87,7886.5 ; 56.5,6086.5 10897.48,6086.5 10897.48,7886.5 56.5,7886.5 56.5,6086.5
  text "Symbol" at 146.5,7781.5 h72
  text "Count" at 652.38,7781.5 h72
  text "Hole Size" at 1302.2,7781.5 h72
  text "Plated" at 2431.87,7781.5 h72
  text "Hole Type" at 2937.75,7781.5 h72
  text "Drill Layer Pair" at 3671.55,7781.5 h72
  text "Via/Pad" at 5171.1,7781.5 h72
  text "Pad Shape" at 5760.95,7781.5 h72
  text "Template" at 6506.75,7781.5 h72
  text "Description" at 7376.5,7781.5 h72
  text "Hole Tolerance (+)" at 8230.26,7781.5 h72
  text "Hole Tolerance (-)" at 9563.87,7781.5 h72
  text "2" at 652.38,7631.5 h60
  text "43.31mil (1.100mm)" at 1302.2,7631.5 h60
  text "PTH" at 2431.87,7631.5 h60
  text "Round" at 2937.75,7631.5 h60
  text "Top Layer - Bottom Layer" at 3671.55,7631.5 h60
  text "Pad" at 5171.1,7631.5 h60
  text "(Mixed)" at 5760.95,7631.5 h60
  text "(Mixed)" at 6506.75,7631.5 h60
  text "2" at 652.38,7481.5 h60
  text "114.17mil (2.900mm)" at 1302.2,7481.5 h60
  text "PTH" at 2431.87,7481.5 h60
  text "Round" at 2937.75,7481.5 h60
  text "Top Layer - Bottom Layer" at 3671.55,7481.5 h60
  text "Pad" at 5171.1,7481.5 h60
  text "Rounded" at 5760.95,7481.5 h60
  text "c508h290m0mx0" at 6506.75,7481.5 h60
  text "4" at 652.38,7331.5 h60
  text "40.16mil (1.020mm)" at 1302.2,7331.5 h60
  text "PTH" at 2431.87,7331.5 h60
  text "Round" at 2937.75,7331.5 h60
  text "Top Layer - Bottom Layer" at 3671.55,7331.5 h60
  text "Pad" at 5171.1,7331.5 h60
  text "(Mixed)" at 5760.95,7331.5 h60
  text "(Mixed)" at 6506.75,7331.5 h60
  text "6" at 652.38,7181.5 h60
  text "62.99mil (1.600mm)" at 1302.2,7181.5 h60
  text "PTH" at 2431.87,7181.5 h60
  text "Round" at 2937.75,7181.5 h60
  text "Top Layer - Bottom Layer" at 3671.55,7181.5 h60
  text "Pad" at 5171.1,7181.5 h60
  text "(Mixed)" at 5760.95,7181.5 h60
  text "(Mixed)" at 6506.75,7181.5 h60
  text "16" at 652.38,7031.5 h60
  text "7.87mil (0.200mm)" at 1302.2,7031.5 h60
  text "PTH" at 2431.87,7031.5 h60
  text "Round" at 2937.75,7031.5 h60
  text "Top Layer - Bottom Layer" at 3671.55,7031.5 h60
  text "Via" at 5171.1,7031.5 h60
  text "Rounded" at 5760.95,7031.5 h60
  text "v50h20m0mx0" at 6506.75,7031.5 h60
  text "21" at 652.38,6881.5 h60
  text "20.00mil (0.508mm)" at 1302.2,6881.5 h60
  text "PTH" at 2431.87,6881.5 h60
  text "Round" at 2937.75,6881.5 h60
  text "Top Layer - Bottom Layer" at 3671.55,6881.5 h60
  text "Via" at 5171.1,6881.5 h60
  text "Rounded" at 5760.95,6881.5 h60
  text "v102h51" at 6506.75,6881.5 h60
  text "91" at 652.38,6731.5 h60
  text "40.00mil (1.016mm)" at 1302.2,6731.5 h60
  text "PTH" at 2431.87,6731.5 h60
  text "Round" at 2937.75,6731.5 h60
  text "Top Layer - Bottom Layer" at 3671.55,6731.5 h60
  text "Pad" at 5171.1,6731.5 h60
  text "(Mixed)" at 5760.95,6731.5 h60
  text "(Mixed)" at 6506.75,6731.5 h60
  text "105" at 652.38,6581.5 h60
  text "14.00mil (0.356mm)" at 1302.2,6581.5 h60
  text "PTH" at 2431.87,6581.5 h60
  text "Round" at 2937.75,6581.5 h60
  text "Top Layer - Bottom Layer" at 3671.55,6581.5 h60
  text "Via" at 5171.1,6581.5 h60
  text "Rounded" at 5760.95,6581.5 h60
  text "v61h36" at 6506.75,6581.5 h60
  text "132" at 652.38,6431.5 h60
  text "9.80mil (0.249mm)" at 1302.2,6431.5 h60
  text "PTH" at 2431.87,6431.5 h60
  text "Round" at 2937.75,6431.5 h60
  text "Top Layer - Bottom Layer" at 3671.55,6431.5 h60
  text "Via" at 5171.1,6431.5 h60
  text "Rounded" at 5760.95,6431.5 h60
  text "v61h25(1)" at 6506.75,6431.5 h60
  text "653" at 652.38,6281.5 h60
  text "10.00mil (0.254mm)" at 1302.2,6281.5 h60
  text "PTH" at 2431.87,6281.5 h60
  text "Round" at 2937.75,6281.5 h60
  text "Top Layer - Bottom Layer" at 3671.55,6281.5 h60
  text "Via" at 5171.1,6281.5 h60
  text "Rounded" at 5760.95,6281.5 h60
  text "(Mixed)" at 6506.75,6281.5 h60
  text "1032 Total" at 652.38,6131.5 h60
Mechanical 17:
  text ".Layer_Name" at 577,-858.49 h60
Mechanical 18:
  text ".Layer_Name" at 577,-858.49 h60
Mechanical 19:
  text ".Layer_Name" at 577,-858.49 h60

## Dimensions
0,-400 to 1000,-400 on M2 Board Dimensions
0,0 to 4409,3307 on M2 Board Dimensions
0,0 to 4409.45,0 on M2 Board Dimensions

## Text inside footprints (layer, text, board x,y; h text height)
LOGO6: Top Overlay "For evaluation only; not FCC approved for resale." at 56,1574 h60 r90